# Altium PCB EasyGate1541 DIP-40.PcbDoc
Units mm, origin at the board's own origin, x right, y up, seen from the top; angles counter-clockwise.
Board outline 18.29 x 51.31 mm, 2 copper layers (Top Layer, Bottom Layer), stack 0.969 mm thick; 17 components, 45 nets, 115 pads, 35 vias.
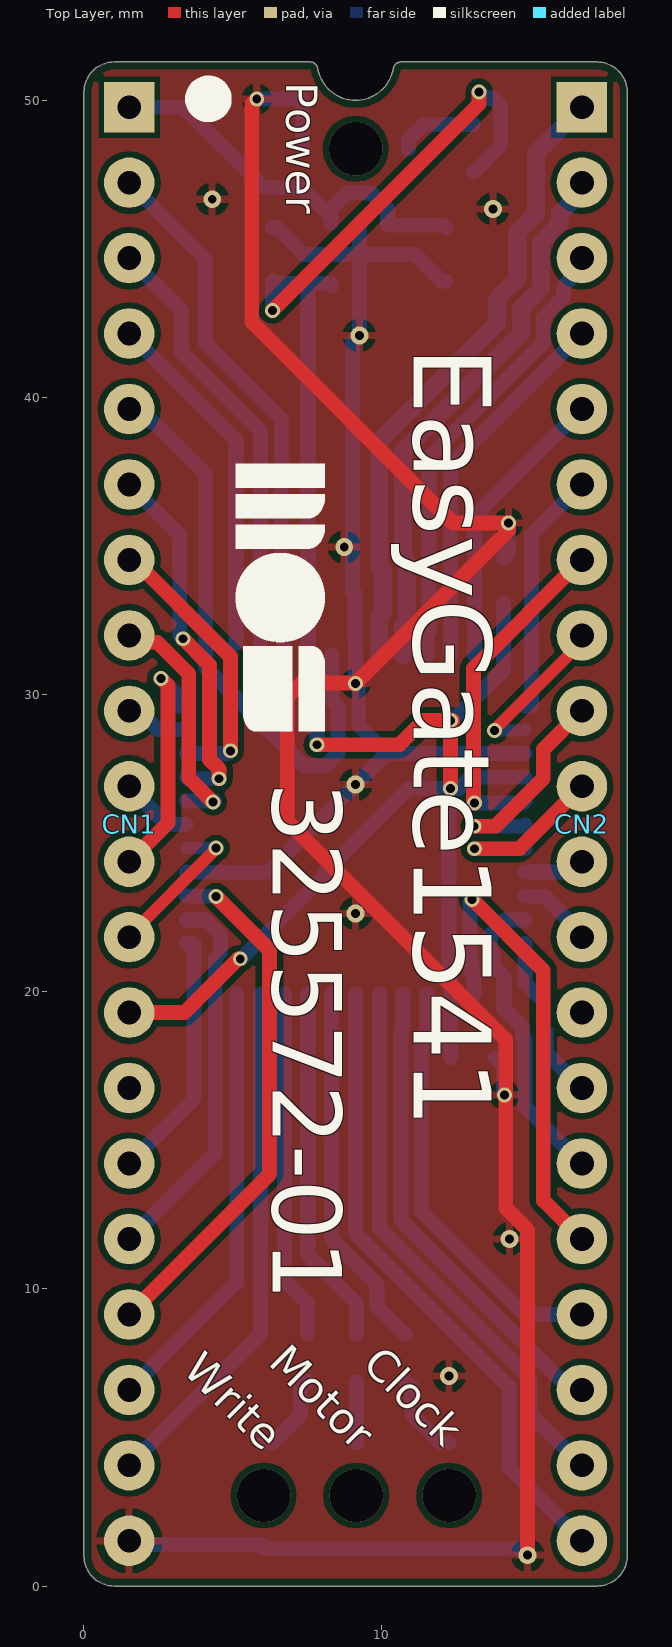
[diagram p0: Top Layer view]
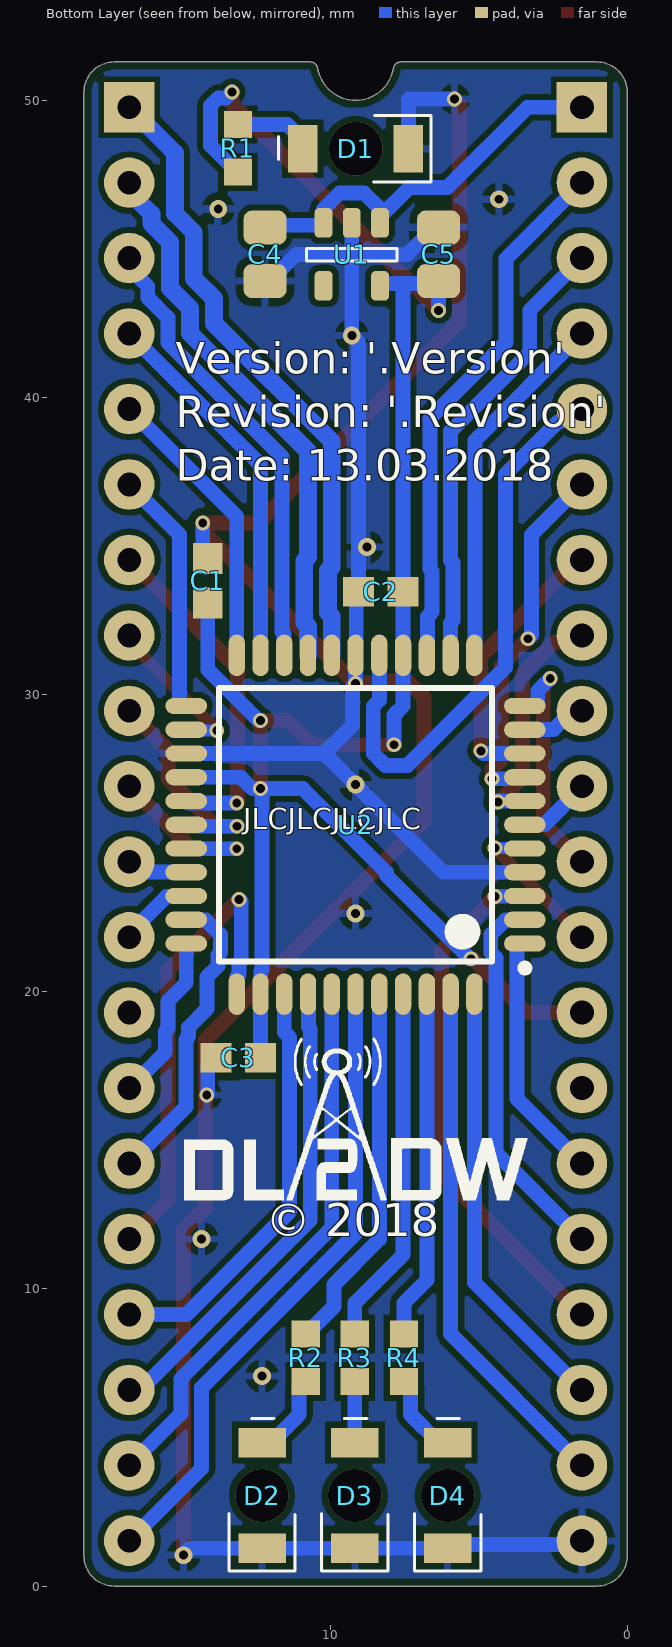
[diagram p1: Bottom Layer view, seen from below]
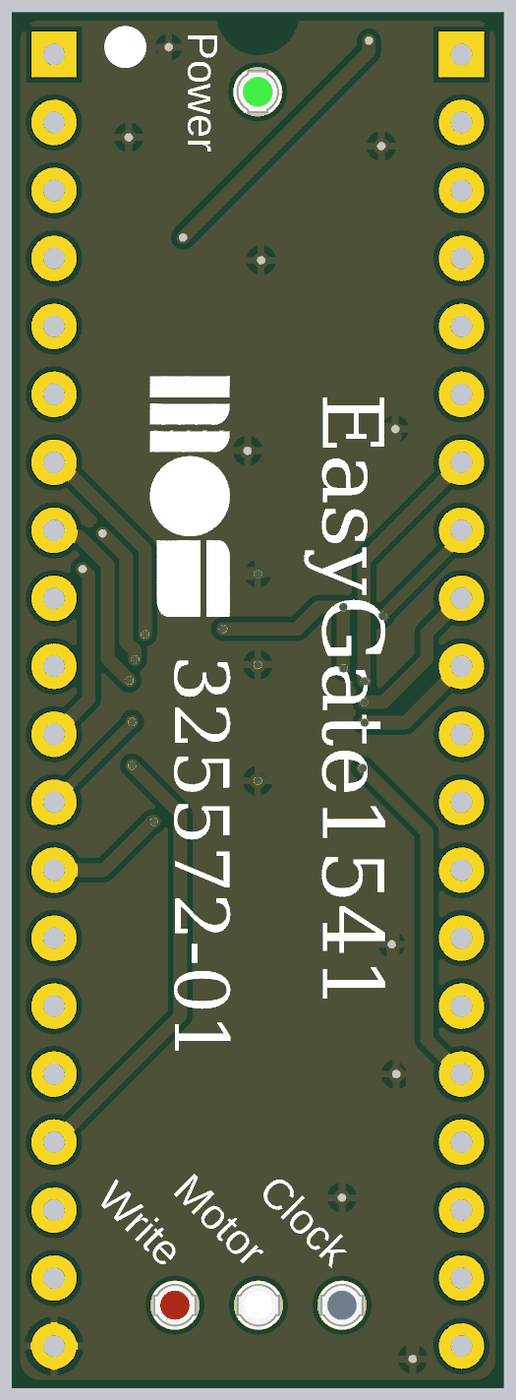
[diagram p2: 3D render of the assembled board from above, using the file's embedded part models]
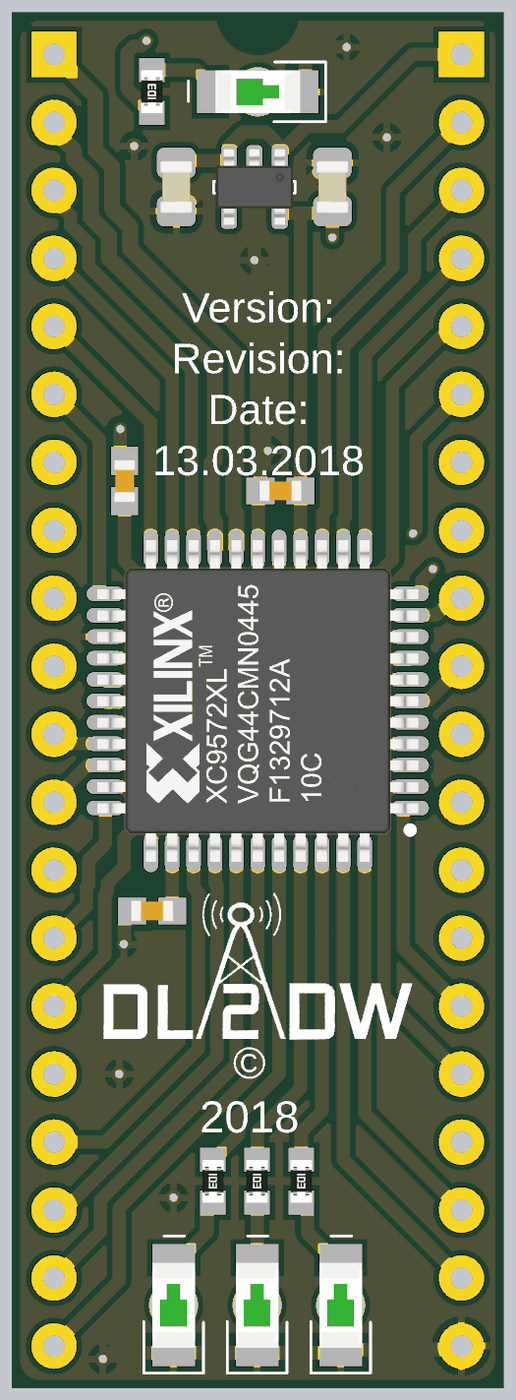
[diagram p3: 3D render of the assembled board from below, using the file's embedded part models]

## Layer stack, top to bottom
Top Solder: solder mask 0.0254, SM-001, Dk 4
Top Layer: signal copper 0.035
Dielectric 1: core 0.8986, Core-043, Dk 4.3
Bottom Layer: signal copper 0.035
Bottom Solder: solder mask 0.0254, SM-001, Dk 4

## Board outline
0,1.016 0,50.292 cw(c1.016,50.292) 1.016,51.308 7.62,51.308 cw(c7.62,51.054) 7.874,51.054 7.879,51.055 ccw(c9.144,51.308) 10.409,51.055 10.414,51.054 cw(c10.668,51.054) 10.668,51.308 17.272,51.308 cw(c17.272,50.292) 18.288,50.292 18.288,1.016 cw(c17.272,1.016) 17.272,0 1.016,0 cw(c1.016,1.016)

## Design rules (kind name [scope] priority, off if disabled: settings)
BoardOutlineClearance [All] p1: gap=0.254 ignorepadtopadclearanceinfootprint=FALSE
Clearance [All] p1: gap=0.2 ignorepadtopadclearanceinfootprint=TRUE
ComponentClearance ComponentClearance_Sheet [HasFootprint('PCB Title Block DIN A4')] p1: gap=0 collisioncheckmode=3 verticalgap=0 showdistances=FALSE
ComponentClearance [All] p2: gap=0.254 collisioncheckmode=3 verticalgap=0.254 showdistances=FALSE
MinimumSolderMaskSliver [All] p1: minsoldermaskwidth=0.103
PolygonConnect [All] p1: connectstyle=Relief reliefconductorwidth=0.254 reliefentries=4 polygonreliefangle="90 Angle" airgapwidth=0.254
RoutingVias RoutingVias_Power [(InNet('VCC') OR InNet('GND') OR InNet('+5V'))] p1: holewidth=0.8 width=1.5 viastyle="Through Hole" minholewidth=0.3 minwidth=0.6 maxholewidth=0.8 maxwidth=1.5
RoutingVias [All] p2: holewidth=0.4 width=0.7 viastyle="Through Hole" minholewidth=0.3 minwidth=0.5 maxholewidth=0.5 maxwidth=0.8
SilkToSilkClearance [All] p1: silktosilkclearance=0
SilkToSolderMaskClearance [IsPad] p1: minsilkscreentomaskgap=0.103 clearancetoexposedcopper=TRUE
SolderMaskExpansion [All] p1: expansion=0.038 istentingtop=FALSE
UnRoutedNet [All] p1: checkbadconnections=TRUE
Width Width_Power [(InNet('VCC') OR InNet('GND') OR InNet('+5V'))] p1: maxlimit=1.5 minlimit=0.3 preferedwidth=1.5
Width [All] p2: maxlimit=0.6 minlimit=0.3 preferedwidth=0.4
25 further rules are at their usual default settings.

## Components (designator, comment, footprint, x,y, rotation, side; value= is the part's Value field where it differs from the comment)
C1 "100nF" "CAP 100nF SMD 0603 C0603C104J3RACTU" 14.122,33.846 r270 bottom
C2 "100nF" "CAP 100nF SMD 0603 C0603C104J3RACTU" 8.294,33.477 r180 bottom
C3 "100nF" "CAP 100nF SMD 0603 C0603C104J3RACTU" 13.094,17.781 r180 bottom
C4 "10µF" "Kemet C0805CxxxK8RACTU Series H=1.4mm" 12.192,44.831 r90 bottom
C5 "10µF" "Kemet C0805CxxxK8RACTU Series H=1.4mm" 6.35,44.831 r270 bottom
CN1 "Pin Header Left Side" "Pin Header 01x20 2.54mm precision Horizontal Male" 1.524,49.784 r270 top locked
CN2 "Pin Header Right Side" "Pin Header 01x20 2.54mm precision Horizontal Male" 16.764,49.784 r270 top locked
D1 "Power" "LED green Gullwing Everlight 25-21/GHC-YSU/2A" 9.144,48.387 r0 top
D2 "Clock" "LED blue Gullwing Everlight 25-21/BHC-XR2S1/2A" 12.294,3.048 r90 top locked
D3 "Motor" "LED white Gullwing Everlight 25-21/T1D-ANQHY/2A" 9.169,3.048 r90 top locked
D4 "Writing" "LED red Gullwing Everlight 25-21SURC/S530-A4/TR8" 6.045,3.048 r90 top locked
R1 "1k" "1k Ohm R 0603 SMD" 13.106,48.4 r90 bottom
R2 "1k" "1k Ohm R 0603 SMD" 10.82,7.683 r270 bottom
R3 "1k" "1k Ohm R 0603 SMD" 9.169,7.683 r270 bottom
R4 "1k" "1k Ohm R 0603 SMD" 7.518,7.683 r270 bottom
U1 "SPX5205M5-L-3-3/TR" SOT-23-5 9.271,44.831 r0 bottom
U2 "XC9572XL-10VQG44C" XC9572XL-10VQG44C 9.144,25.629 r0 bottom locked

## Footprints (in the part's own frame and the unit in brackets; to place one, negate y for a bottom-side part, rotate by r counter-clockwise, add the part's x,y. Pads: shape width x height; smd on the part's side, far side on the other; paste and mask are expansions set on the pad)
"1k Ohm R 0603 SMD" [mm] "Chip Resistor 2-Leads, Body 1,60x0,80mm, IPC Medium Density"
  rect 0.9x0.95 smd: 1(-0.8,0) 2(0.8,0)
  body extent -0.8,-0.4 0.8,0.4, height 0.45
"CAP 100nF SMD 0603 C0603C104J3RACTU" [mm] "Chip Capacitor, 2-Leads, Body 1,60x0,80mm, IPC Medium Density"
  rect 1.05x1 smd: 1(-0.75,0) 2(0.75,0)
  body extent -0.8,-0.4 0.8,0.4, height 0.87
"Kemet C0805CxxxK8RACTU Series H=1.4mm" [mm]
  rrect50% 1.15x1.45 smd: 1(-0.9,0) 2(0.9,0)
  body extent -1,-0.63 1,0.63, height 1.4
"LED blue Gullwing Everlight 25-21/BHC-XR2S1/2A" [mm]
  rect 1x1.6 smd far side: 1(-1.778,0) 2(1.778,0)
  body extent -1.6,-0.8 1.6,0.8, height 0.3
"LED green Gullwing Everlight 25-21/GHC-YSU/2A" [mm]
  rect 1x1.6 smd far side: 1(-1.778,0) 2(1.778,0)
  body extent -1.6,-0.8 1.6,0.8, height 0.3
"LED red Gullwing Everlight 25-21SURC/S530-A4/TR8" [mm]
  rect 1x1.6 smd far side: 1(-1.778,0) 2(1.778,0)
  body extent -1.6,-0.8 1.6,0.8, height 0.3
"LED white Gullwing Everlight 25-21/T1D-ANQHY/2A" [mm]
  rect 1x1.6 smd far side: 1(-1.778,0) 2(1.778,0)
  body extent -1.6,-0.8 1.6,0.8, height 0.3
"Pin Header 01x20 2.54mm precision Horizontal Male" [mm] "Precision"
  rect 1.7x1.7 hole 0.8: 1(0,0)
  round 1.7 hole 0.8: 2(2.54,0) 3(5.08,0) 4(7.62,0) 5(10.16,0) 6(12.7,0) 7(15.24,0) 8(17.78,0) 9(20.32,0) 10(22.86,0) 11(25.4,0) 12(27.94,0) 13(30.48,0) 14(33.02,0) 15(35.56,0) 16(38.1,0) 17(40.64,0) 18(43.18,0) 19(45.72,0) 20(48.26,0)
  body extent -1.27,-1.27 49.53,1.27, height 2
SOT-23-5 [mm]
  rrect50% 0.6x1 smd: 1(-0.95,-1.06) 2(0,-1.06) 3(0.95,-1.06) 4(0.95,1.06) 5(-0.95,1.06)
  silkscreen extent -1.52,-0.2 1.52,0.23, body extent -1.45,-1.41 1.45,1.41, height 1.3
XC9572XL-10VQG44C [mm] "TQFP, 44-Leads, Body 10,00x10,00mm, Pitch 0,80mm, IPC Medium Density"
  oval 1.4x0.55 smd: 1(-5.7,4) 2(-5.7,3.2) 3(-5.7,2.4) 4(-5.7,1.6) 5(-5.7,0.8) 6(-5.7,0) 7(-5.7,-0.8) 8(-5.7,-1.6) 9(-5.7,-2.4) 10(-5.7,-3.2) 11(-5.7,-4) 23(5.7,-4) 24(5.7,-3.2) 25(5.7,-2.4) 26(5.7,-1.6) 27(5.7,-0.8) 28(5.7,0) 29(5.7,0.8) 30(5.7,1.6) 31(5.7,2.4) 32(5.7,3.2) 33(5.7,4)
  oval 0.55x1.4 smd: 12(-4,-5.7) 13(-3.2,-5.7) 14(-2.4,-5.7) 15(-1.6,-5.7) 16(-0.8,-5.7) 17(0,-5.7) 18(0.8,-5.7) 19(1.6,-5.7) 20(2.4,-5.7) 21(3.2,-5.7) 22(4,-5.7) 34(4,5.7) 35(3.2,5.7) 36(2.4,5.7) 37(1.6,5.7) 38(0.8,5.7) 39(0,5.7) 40(-0.8,5.7) 41(-1.6,5.7) 42(-2.4,5.7) 43(-3.2,5.7) 44(-4,5.7)
  silkscreen extent -5.82,-4.6 4.6,4.95, body extent -6.01,-6.01 6.01,6.01, height 1.1

## Part data
C1 C2 C3: library part CMP-Capacitors-Ceramic_Capacitors-00012-1, "KEMET         C0603C104J3RACTU             SMD Multilayer Ceramic Capacitor, 0603 [1608 Metric], 0.1 F, 25 V,  5%, X7R, C Series", Case Code (Imperial)=0603, Case Code (Metric)=1608, Dielectric=X7R, Dielectric Material=Ceramic, Max Operating Temperature=125°C, Min Operating Temperature=-55°C, Package Quantity=4000, Tolerance=5%, Voltage=25V, Capacitance=100nF, Case/Package=0603, Contact Plating=Tin,Matte, Depth=0.8mm, Height=0.8mm, Lead Pitch=0.7mm, Length=1.6mm, Mount="Surface Mount,PCB", Number of Pins=2, Packaging="Tape and Reel", Radiation Hardening=No, REACH SVHC="No SVHC", Termination=SMD/SMT, Thickness=0.034inch, Voltage Rating=25V, Voltage Rating (DC)=25V, Width=0.031inch
C4 C5: library part CMP-Capacitors-Ceramic_Capacitors-00016-2, "KEMET - C0805C106K8RACTU - CAP, 10µF, 10V, 10%, X7R, 0805", Capacitance=10uF, Case Code (Imperial)=0805, Case Code (Metric)=2012, Dielectric=X7R, Dielectric Material=Ceramic, Max Operating Temperature=125°C, Min Operating Temperature=-55°C, Package Quantity=1, Tolerance=10%, Voltage=10V, Case/Package=0805, Depth=1.25mm, Dissipation Factor=7.5%, Height=1.25mm, Length=2mm, Mount="Surface Mount,PCB", Packaging="Tape and Reel", REACH SVHC="No SVHC", Termination=SMD/SMT, Thickness=0.055inch, Voltage Rating=10V, Voltage Rating (DC)=10V, Width=1.2mm
CN1 CN2: library part CMP-Connectors-Male_PIN_Headers-00031-2, "Conn Header Vert 20POS 2MM", Color=Black, Package Quantity=250, Connector Type="Male Pin", Contact Mating Length=0.141inch, Contact Plating=Gold, Mount="Through Hole", Number of Positions=20, Number of Rows=1, Packaging=Bulk, Pitch=0.079inch, Termination=Solder
D1: library part CMP-LEDs-00010-1, "LED Uni-Color Green 518nm 2-Pin Chip LED T/R", Color=Green, Forward Current=20mA, Forward Voltage=3.5V, Dominant Wavelength=525nm, Lens Style=Diffused,Colorless,Circular, Mount="Surface Mount", Number of LEDs=1, Number of Pins=2, Packaging="Tape and Reel", Radiation Hardening=No, Viewing Angle=60°
D2: library part CMP-LEDs-00012-1, "LED Uni-Color Blue 468nm Chip LED 2-Pin SMD T/R", Forward Current=20mA
D3: library part CMP-LEDs-00011-1, "Standard LEDs - SMD SMD LED", Case/Package=SMD/SMT, Color=White, Forward Current=25mA, Forward Voltage=2.92V, Lens Color=Yellow, Max Operating Temperature=85°C, Min Operating Temperature=-40°C, Package Quantity=2000, Power Dissipation=95mW, Reverse Voltage=5V, Test Current=5mA, Depth=1.6mm, Height=1.1mm, Length=3.2mm, Lens Style=Diffused,Colored,Circular, Lens Transparency=Diffused, Luminous Intensity=70mcd, Mount="Surface Mount", Number of Elements=1, Number of LEDs=1, Number of Pins=2, Packaging="Tape and Reel", Radiation Hardening=No, Viewing Angle=130°, Width=1.6mm
D4: library part CMP-LEDs-00009-3, "SMD LED red 2.7. . .3.15 V Bottom View, 25-21SURC/S530-A4/TR8, Everlight Electronics", Forward Current=20mA
R1 R2 R3 R4: library part CMP-Resistors-Yageo_SMD_060300002-1, "RES SMD 1K OHM 1% 1/10W 0603", Case Code (Imperial)=0603, Case Code (Metric)=1608, Max Operating Temperature=155°C, Min Operating Temperature=-55°C, Power Rating=100mW, Resistance=1kR, Temperature Coefficient=100ppm/°C, Tolerance=1%, Voltage Rating=50V, Case/Package=0603, Composition="Thick Film", Contact Plating=Tin,Matte, Depth=0.8mm, Height=0.45mm, Lead Free="Lead Free", Length=1.6mm, Military Standard=Not, Packaging="Tape and Reel", Radiation Hardening=No, REACH SVHC="No SVHC", Termination=SMD/SMT
U1: library part CMP-ICs-Power_Supply-00002-2, "LDO Regulator Pos 3.3V 0.15A 5-Pin SOT-23 T/R", Case/Package=SOT-23, Dropout Voltage=210mV, Max Input Voltage=16V, Max Operating Temperature=125°C, Max Output Current=150mA, Min Input Voltage=2.5V, Min Operating Temperature=-40°C, Min Output Voltage=3.3V, Quiescent Current=1uA, Accuracy=1%, Height=1.15mm, Lead Free="Lead Free", Length=2.9mm, Mount="Surface Mount", Number of Outputs=1, Number of Pins=5, Number of Regulators=1, Output Current=150mA, Output Type=Fixed, Output Voltage=3.3V, Packaging="Tape and Reel", Polarity=Positive, Radiation Hardening=No, Width=1.6mm
U2: library part CMP-ICs-CPLD_FPGA-00003-1, "XILINX - XC9572XL-10VQG44C. - CPLD, 72 MACROCELL, 3.3V, 44VQFP", Case/Package=TQFP, Frequency=178MHz, Max Frequency=100MHz, Max Operating Temperature=70°C, Max Supply Voltage=3.6V, Min Operating Temperature=0°C, Min Supply Voltage=3V, Operating Supply Voltage=3.3V, Package Quantity=160, Lead Free="Lead Free", Memory Type=FLASH, Mount="Surface Mount", Number of Gates=1600, Number of I/Os=34, Number of Logic Blocks (LABs)=4, Number of Logic Elements/Cells=4, Number of Macrocells=72, Number of Pins=44, Packaging=Tray, Propagation Delay=10ns, Radiation Hardening=No, REACH SVHC="No SVHC", Speed Grade=10, Termination=SMD/SMT, Turn-On Delay Time=10ns

## Via types
v1: diameter 0.5, hole 0.3, Top Layer to Bottom Layer, tented both sides, 22 vias
v2: diameter 0.6, hole 0.3, Top Layer to Bottom Layer, tented both sides, 9 vias
v3: diameter 1.8, hole 1.8, Top Layer to Bottom Layer, 4 vias

## Nets (pads, with @x,y where several pads share a name; then routed paths per layer and width w, separated by ;. In a path a pad name is that pad's centre, name@x,y a point inside that pad or via, vN(x,y) a via of type N, cw(c..) or ccw(c..) an arc to the next point about the centre after c; other vN are vias at no path point)
+3V3: C1.2 C2.2 C3.2 C5.2 CN1.13 R1.1 U1.5 U2.15 U2.26 U2.35 | length 70.2
  Top Layer w0.5: CN1.13 3.378,19.304 5.19,21.116 v1(5.261,21.116) ; v1(6.35,42.946) 13.304,49.9 v1(13.304,50.298) ; v1(7.849,28.321) 10.617,28.321 11.429,29.132 v1(12.344,29.132) ; v1(12.344,26.843) 12.344,29.057 12.418,29.131 v1@12.418,29.135
  Bottom Layer w0.5: v1(5.261,21.116) 5.294,21.116 8.106,23.927 8.106,24.032 10.917,26.843 v1(12.344,26.843) ; v1(6.35,42.946) C5.2 6.43,43.851 7.4,43.851 ; v1(7.849,28.321) 7.849,29.325 7.544,29.629 U2.15 7.544,31.729 C2.2 7.544,43.707 7.4,43.851 ; U1.5 8.321,43.851 7.4,43.851 ; C3.2 U2.35 12.334,19.939 12.334,20.708 12.294,20.749 12.294,26.793 v1(12.344,26.843) ; v1(12.344,29.132) 12.398,29.132 14.122,30.857 C1.2 ; R1.1 13.131,47.6 14.031,48.5 14.031,49.836 13.768,50.1 13.502,50.1 v1(13.304,50.298) ; U2.26 13.005,27.229 12.619,26.843 v1(12.344,26.843)
+5V: C4.2 CN1.1 U1.1 U1.3 | length 13.7
  Bottom Layer w0.5: CN1.1 3.351,49.784 6.048,47.087 7.325,47.087 U1.1@8.321,46.091 ; U1.1 U1.1@8.321,46.091 ; C4.2 12.112,45.811 10.221,45.811 U1.3 10.221,46.36 9.69,46.891 8.852,46.891 8.321,46.36 U1.1@8.321,46.091
A: CN1.6 U2.8 | length 12.3
  Top Layer w0.5: v1(3.34,31.889) 4.228,31.002 4.228,27.828 4.547,27.509 v1(4.547,27.178)
  Bottom Layer w0.5: CN1.6 3.226,35.382 3.226,32.003 v1(3.34,31.889) ; U2.8 3.495,27.178 v1(4.547,27.178)
B: CN2.1 U2.18 | length 21.4
  Bottom Layer w0.6: U2.18 9.944,32.645 10.069,32.77 10.069,34.184 9.944,34.309 9.944,38.536 13.914,42.506 13.914,43.345 14.591,44.022 14.591,45.572 15.218,46.199 15.218,48.238 CN2.1
B\: CN1.2 U2.14 | length 17.7
  Bottom Layer w0.5: CN1.2 4.082,44.686 4.082,41.868 6.644,39.307 6.644,34.239 6.569,34.164 6.569,32.791 6.719,32.641 U2.14@6.719,31.729
BR: CN2.2 U2.19 | length 18.5
  Bottom Layer w0.6: U2.19 10.744,32.314 10.869,32.439 10.869,34.516 10.744,34.64 10.744,38.205 14.714,42.175 14.714,43.013 15.391,43.69 15.391,45.24 16.018,45.868 16.018,46.201 16.764,46.946 CN2.2
CLK: CN1.19 U2.43 | length 17.7
  Bottom Layer w0.5: CN1.19 5.944,8.484 U2.43
CLK-IN: CN2.18 U2.37 | length 16.1
  Bottom Layer w0.5: U2.37 10.734,19.919 10.734,18.823 10.669,18.757 10.669,12.321 16.157,6.834 16.534,6.834 CN2.18
Clock: R2.1 U2.40 | length 12.5
  Bottom Layer w0.5: U2.40 8.344,11.677 9.869,10.151 9.869,9.409 10.795,8.483 R2.1
CLR: CN2.20 U2.39 | length 21.6
  Bottom Layer w0.5: U2.39 9.144,11.867 14.326,6.685 14.326,3.962 CN2.20
D-IN: CN2.17 U2.36 | length 14.2
  Bottom Layer w0.5: U2.36 11.544,18.642 11.369,18.467 11.369,12.611 14.836,9.144 CN2.17
GND: C1.1 C2.1 C3.1 C4.1 C5.1 CN1.20 D1.1 D2.1 D3.1 D4.1 U1.2 U2.4 U2.17 U2.25 | length 118.9
  Top Layer w0.5: v1(5.817,50.057) 5.65,49.891 5.65,42.559 12.421,35.789 v1(14.289,35.789) 14.289,35.524 v1(9.144,30.379) 9.125,30.398 8.098,30.398 8.02,30.476 7.401,30.476 6.844,29.919 6.844,25.744 14.199,18.39 14.199,16.58 v1(14.154,16.535) ; v1@14.199,16.535 14.199,12.725 14.936,11.988 v2(14.936,1.04)
  Bottom Layer w0.5: CN1.20 1.651,1.397 5.918,1.397 D4.1 D3.1 D2.1 14.705,1.27 v2(14.936,1.04) ; U2.4@3.454,24.039 3.463,24.029 6.194,24.029 10.194,28.029 ; v1(5.817,50.057) 7.349,50.057 7.366,50.041 D1.1 ; C5.1 6.5,45.731 7.4,44.831 9.271,44.831 ; U1.2 9.271,44.831 ; C4.1 12.042,43.931 11.142,44.831 9.271,44.831 ; C3.1 13.869,17.781 14.119,17.531 14.119,16.57 v1(14.154,16.535) ; C1.1 14.289,34.762 v1(14.289,35.789) ; U2.25 10.194,28.029 ; 9.271,44.831 v2(9.271,42.099) 9.044,41.872 C2.1 9.119,33.402 9.119,31.729 9.144,31.704 U2.17 v1(9.144,30.379) 9.249,30.274 9.249,28.974 10.194,28.029
  other v2: 12.294,7.069 14.326,11.684 9.144,22.644 9.144,26.979 8.763,34.976 13.768,46.36 4.318,46.685
LOAD: CN2.19 U2.38 | length 18.7
  Bottom Layer w0.5: U2.38 9.944,12.056 15.026,6.975 15.026,5.802 CN2.19
M\T\R\: CN1.5 U2.16 | length 19.4
  Bottom Layer w0.5: CN1.5 1.849,39.624 2.29,39.183 2.346,39.183 4.102,37.427 4.102,30.92 7.402,27.621 8.139,27.621 8.549,28.031 8.549,29.615 8.344,29.819 U2.16
Motor: R3.1 U2.41 | length 12.1
  Bottom Layer w0.5: U2.41 7.544,11.151 9.169,9.526 R3.1
MTR: CN1.8 U2.7 | length 8.2
  Top Layer w0.5: CN1.8 1.754,31.774 2.465,31.774 3.528,30.712 3.528,27.206 v1(4.343,26.391)
  Bottom Layer w0.4: v1(4.343,26.391) v1@4.394,26.391
  Bottom Layer w0.5: U2.7 4.394,26.429 v1@4.394,26.391
NetD1_2: D1.2 R1.2 | length 2.7
  Bottom Layer w0.5: D1.2 10.922,48.687 11.435,49.2 R1.2
NetD2_2: D2.2 R2.2 | length 2.9
  Bottom Layer w0.5: R2.2 10.845,6.883 11.045,6.683 11.045,5.774 11.994,4.826 D2.2
NetD3_2: D3.2 R3.2 | length 2.1
  Bottom Layer w0.5: D3.2 R3.2
NetD4_2: D4.2 R4.2 | length 2.9
  Bottom Layer w0.5: D4.2 6.345,4.826 7.293,5.774 7.293,6.683 7.493,6.883 R4.2
OE: CN2.5 U2.22 | length 9.8
  Bottom Layer w0.5: U2.22 13.144,36.004 CN2.5
Q: CN1.4 U2.12 | length 11.9
  Bottom Layer w0.5: CN1.4 5.119,38.569 U2.12@5.119,31.729
Q-OUT: CN2.16 U2.34 | length 16.2
  Top Layer w0.5: v1(13.069,23.115) 15.464,20.72 15.464,12.984 CN2.16
  Bottom Layer w0.5: v1(13.069,23.115) 12.994,23.04 12.994,21.039 13.069,20.964 13.069,20.591 13.134,20.526 13.134,19.939 U2.34
Q\: CN1.3 U2.13 | length 15.3
  Bottom Layer w0.5: CN1.3 3.282,42.946 3.282,41.537 5.944,38.875 5.944,34.529 5.869,34.454 5.869,32.501 5.944,32.426 U2.13
SOE: CN2.3 U2.20 | length 15.5
  Bottom Layer w0.5: U2.20 11.554,31.339 11.554,32.063 11.619,32.128 11.619,38.019 15.464,41.864 15.464,42.702 16.141,43.38 16.141,43.756 16.764,44.379 CN2.3
STEP0: CN1.12 U2.5 | length 5.2
  Top Layer w0.4: CN1.12 1.524,21.893 4.445,24.814 v1(4.445,24.841)
  Bottom Layer w0.4: U2.5 3.456,24.841 v1(4.445,24.841)
STEP1: CN1.10 U2.6 | length 2.5
  Bottom Layer w0.5: CN1.10 1.524,26.899 2.784,25.639 3.434,25.639 U2.6
SYNC: CN2.4 U2.21 | length 12.7
  Bottom Layer w0.5: U2.21 12.344,37.744 CN2.4
TCK: CN1.11 U2.11 | length 8.3
  Top Layer w0.5: CN1.11 2.824,25.684 2.824,30.323 v1(2.591,30.556)
  Bottom Layer w0.5: v1(2.591,30.556) 3.009,30.138 3.009,29.652 3.033,29.629 U2.11
TDI: CN1.7 U2.9 | length 9.4
  Top Layer w0.5: CN1.7 1.675,34.544 4.928,31.291 v1(4.928,28.118)
  Bottom Layer w0.5: U2.9 4.839,28.029 v1(4.928,28.118)
TDO: CN2.8 U2.24 | length 5.5
  Top Layer w0.4: v1(13.818,28.804) 13.818,28.831 16.764,31.777 CN2.8
  Bottom Layer w0.4: v1(13.818,28.804) 14.819,28.804 U2.24
TMS: CN1.9 U2.10 | length 2.2
  Bottom Layer w0.5: CN1.9 1.849,29.464 2.474,28.839 3.434,28.839 U2.10
Write: R4.1 U2.42 | length 11.8
  Bottom Layer w0.5: U2.42 6.744,10.3 7.518,9.526 R4.1
Y0: CN1.18 U2.44 | length 14.8
  Bottom Layer w0.5: CN1.18 5.144,10.224 U2.44
Y1: CN1.17 U2.3 | length 17.8
  Top Layer w0.5: CN1.17 6.248,13.868 6.248,21.412 v1(4.445,23.216)
  Bottom Layer w0.5: U2.3 3.454,23.219 4.441,23.219 v1(4.445,23.216)
Y2: CN1.16 U2.2 | length 12.9
  Bottom Layer w0.5: CN1.16 4.419,14.579 4.419,21.154 4.594,21.329 4.594,21.929 4.104,22.419 3.454,22.419 U2.2
Y3: CN1.15 U2.1 | length 8.6
  Bottom Layer w0.5: CN1.15 3.708,16.408 3.708,21.606 3.685,21.629 U2.1
YB0: CN2.15 U2.32 | length 10.3
  Bottom Layer w0.5: U2.32 14.834,22.419 14.184,22.419 13.694,21.929 13.694,21.329 13.781,21.242 13.781,20.869 14.144,20.506 14.144,19.434 14.764,18.814 14.764,18.522 14.819,18.467 14.819,18.421 14.854,18.386 14.854,16.134 CN2.15
YB1: CN2.14 U2.33 | length 5.7
  Bottom Layer w0.5: U2.33 14.844,20.307 15.464,19.687 15.464,18.766 15.554,18.676 15.554,17.974 CN2.14
YB2: CN2.12 U2.31 | length 2.6
  Bottom Layer w0.5: U2.31 14.854,23.219 15.504,23.219 16.764,21.959 CN2.12
YB3: CN2.11 U2.30 | length 2.1
  Bottom Layer w0.5: U2.30 14.854,24.039 16.094,24.039 16.439,24.384 CN2.11
YB4: CN2.10 U2.29 | length 6.2
  Top Layer w0.5: v1(13.144,24.819) 14.659,24.819 CN2.10
  Bottom Layer w0.5: v1(13.144,24.819) 14.834,24.819 U2.29
YB5: CN2.9 U2.28 | length 7.5
  Top Layer w0.5: v1(13.134,25.578) 13.855,25.578 15.464,27.187 15.464,28.164 CN2.9
  Bottom Layer w0.5: v1(13.134,25.578) 14.793,25.578 U2.28
YB6: CN2.7 U2.27 | length 11.4
  Top Layer w0.5: v1(13.144,26.365) 13.118,26.392 13.118,30.898 CN2.7
  Bottom Layer w0.5: v1(13.144,26.365) 14.78,26.365 U2.27
YB7: CN2.6 U2.23 | length 8.4
  Bottom Layer w0.5: U2.23 15.049,29.629 15.072,29.652 15.072,35.392 CN2.6
pads on no net: CN1.14 CN2.13 U1.4
copper on no net:
  other v3: 6.045,3.048 9.169,3.048 12.294,3.048 9.144,48.387

## Polygon pours and split planes (outlines as drawn)
GND on Bottom Layer "Bottom Layer - GND" (solid, remove dead copper, pour order 0): 0,1.016 0,50.292 cw(c1.016,50.292) 1.016,51.308 7.62,51.308 cw(c7.62,51.054) 7.874,51.054 7.879,51.055 ccw(c9.144,51.308) 10.409,51.055 10.414,51.054 cw(c10.668,51.054) 10.668,51.308 17.272,51.308 cw(c17.272,50.292) 18.288,50.292 18.288,1.016 cw(c17.272,1.016) 17.272,0 1.016,0 cw(c1.016,1.016)
GND on Top Layer "Top Layer - GND" (solid, remove dead copper, pour order 1): 0,1.016 0,50.292 cw(c1.016,50.292) 1.016,51.308 7.62,51.308 cw(c7.62,51.054) 7.874,51.054 7.879,51.055 ccw(c9.144,51.308) 10.409,51.055 10.414,51.054 cw(c10.668,51.054) 10.668,51.308 17.272,51.308 cw(c17.272,50.292) 18.288,50.292 18.288,1.016 cw(c17.272,1.016) 17.272,0 1.016,0 cw(c1.016,1.016)

## Silkscreen, mask and mechanical layers (free items; w line width, h text height)
Top Overlay:
  drawing of 8 lines, arcs and shapes, not listed
  text "Power" at 6.45,50.618 h1.8 r270
  text "EasyGate1541" at 10.246,41.725 h4.5 r270
  text "325572-01" at 5.574,27.063 h4 r270
  text "Motor" at 5.913,7.228 h1.8 r315
  text "Clock" at 9.086,7.166 h1.8 r315
  text "Write" at 3.036,6.981 h1.8 r315
Bottom Overlay:
  drawing of 12 lines, arcs and shapes, not listed
  text "Version: '.Version' / Revision: '.Revision' / Date: 13.03.2018" at 15.199,36.858 h1.8
  text "JLCJLCJLCJLC" at 12.917,25.245 h1.2
  text "© 2018" at 12.17,11.411 h1.9
Board:
  lines w0.1: 7.874,51.054 ccw(c7.62,51.054) 7.62,51.308 1.016,51.308 ccw(c1.016,50.292) 0,50.292 0,1.016 ccw(c1.016,1.016) 1.016,0 17.272,0 ccw(c17.272,1.016) 18.288,1.016 18.288,50.292 ccw(c17.272,50.292) 17.272,51.308 10.689,51.308 ; 7.879,51.055 ccw(c9.144,51.308) 10.409,51.055 ; 10.414,51.054 cw(c10.668,51.054) 10.668,51.308